# Altium PCB MVP-Module-Dash-v2.0.PcbDoc (part 6 of 6)
Units mil, origin at the board's own origin, x right, y up, seen from the top; angles counter-clockwise.
Board outline 5314.96 x 3937.01 mil, 4 copper layers (Top, GND, PWR, Bottom), stack 60.118 mil thick; 364 components, 288 nets, 1223 pads, 0 vias.
Unrouted connection lines stored in the file: 976.
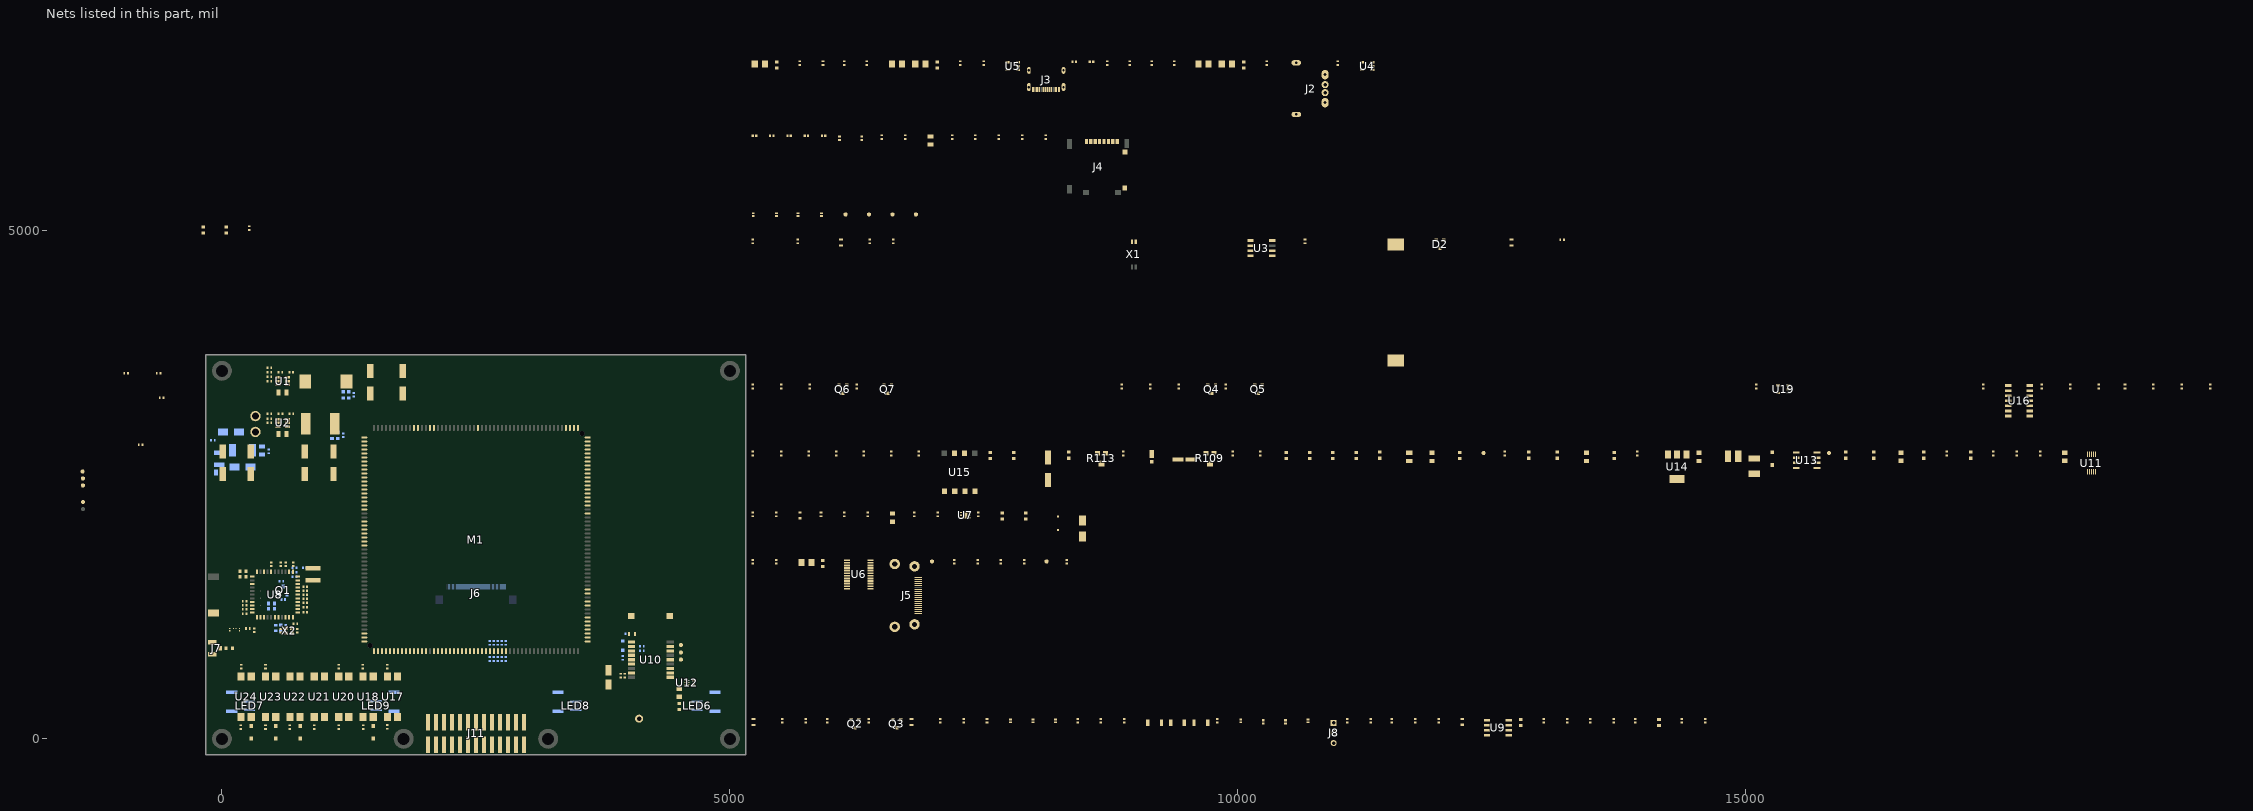
[diagram p2: the nets of this part, all layers, seen from the top]

## Part data (continued)
SW1 SW2 SW3: "SWITCH TACTILE SPST-NO 0.05A 12V", Contact Current Rating=50mA, Contact Resistance=100mR, Insulation Resistance=100MR, LCSC Part Number=C231329, Manufacturer=Omron, Max Operating Temperature=70°C, Max Voltage Rating (DC)=12V, Min Operating Temperature=-25°C, Operating Force=1.5N, Package Quantity=1, Ratings="Dust Proof,IP40", Supplier Part Number 1=SW1020DKR-ND, Actuator Length=0.4mm, Actuator Type=Standard, ComponentLink1Description=http://www.farnell.com/datasheets/60838.pdf?src-supplier=Farnell, ComponentLink1URL=http://www.farnell.com/datasheets/60838.pdf?src-supplier=Farnell, ComponentLink2Description=http://www.farnell.com/datasheets/60838.pdf?src-supplier=Element14, ComponentLink2URL=http://www.farnell.com/datasheets/60838.pdf?src-supplier=Element14, ComponentLink3Description=https://omronfs.omron.com/en_US/ecb/products/pdf/en-b3u.pdf?src-supplier=Digi-Key, ComponentLink3URL=https://omronfs.omron.com/en_US/ecb/products/pdf/en-b3u.pdf?src-supplier=Digi-Key, ComponentLink4Description=http://www.omron.com/ecb/products/pdf/en-b3u.pdf?src-supplier=Digi-Key, ComponentLink4URL=http://www.omron.com/ecb/products/pdf/en-b3u.pdf?src-supplier=Digi-Key, ComponentLink5Description=https://www.distrelec.biz/Web/Downloads/he/et/B3U_eng_datasheet.pdf?mime=application%2Fpdf&src-supplier=Distrelec, ComponentLink5URL=https://www.distrelec.biz/Web/Downloads/he/et/B3U_eng_datasheet.pdf?mime=application%2Fpdf&src-supplier=Distrelec, ComponentLink6Description=http://www.onlinecomponents.com/productFiles/mf-OM/en-b3u.pdf?src-supplier=Onlinecomponents.com, ComponentLink6URL=http://www.onlinecomponents.com/productFiles/mf-OM/en-b3u.pdf?src-supplier=Onlinecomponents.com, ComponentLink7Description=https://www.verical.com/server-webapp/html/getDatasheet?partID=552554&src-supplier=Verical, ComponentLink7URL=https://www.verical.com/server-webapp/html/getDatasheet?partID=552554&src-supplier=Verical, ComponentLink8Description=http://www.farnell.com/datasheets/1685550.pdf?src-supplier=Element14, ComponentLink8URL=http://www.farnell.com/datasheets/1685550.pdf?src-supplier=Element14, ComponentLink9Description=http://www.farnell.com/datasheets/2610940.pdf?src-supplier=Farnell, ComponentLink9URL=http://www.farnell.com/datasheets/2610940.pdf?src-supplier=Farnell, ComponentLink10Description=https://www.alliedelec.com/m/d/4c8a9ef82804fc3c241a13c1e298fd73.pdf?src-supplier=Allied+Electronics, ComponentLink10URL=https://www.alliedelec.com/m/d/4c8a9ef82804fc3c241a13c1e298fd73.pdf?src-supplier=Allied+Electronics, Contact Material=Silver, Current Rating=50mA, Depth=2.5mm, Electrical Life=200000Cycles, Height=1.2mm, Illumination Type=Non-Illuminated,Illuminated, Item Type=Switch, Lead Free="Lead Free", Length=4mm, Manufacturer Part Number=B3U-1000P, Max Current Rating=50mA, Mechanical Life=200000Cycles, Mount="Surface Mount", Orientation=Straight, Packaging="Tape and Reel", Pricing 1="1=1, 10=0.961, 25=0.9064, 50=0.7976, 100=0.7251, 250=0.68888, 500=0.67074, 1000=0.52571 (USD)", REACH SVHC=Unknown, Stock 1=116454, Supplier 1=Digi-Key, Switch Function=Off-Mom, Switch Travel=0.15mm, Termination=SMD/SMT, Throw Configuration=SPST, Voltage Rating (DC)=12V, Weight=0.000776oz, Width=3mm
U1 U2: "IC REG BUCK ADJ 3A TSOT26", Case/Package=SOT-23-6, LCSC Part Number=C2158012, Manufacturer=Diodes, Max Operating Temperature=85°C, Max Output Voltage=31V, Max Supply Voltage=32V, Min Input Voltage=3.8V, Min Operating Temperature=-40°C, Min Output Voltage=800mV, Output Current=3A, Supplier Part Number=31-AP63300WU-7CT-ND, Switching Frequency=500kHz, Category="Voltage Regulators - Switching", ComponentLink1Description=https://www.diodes.com/assets/Datasheets/AP63300-AP63301.pdf?src-supplier=Digikey, ComponentLink1URL=https://www.diodes.com/assets/Datasheets/AP63300-AP63301.pdf?src-supplier=Digikey, ComponentLink2Description=https://datasheet.octopart.com/AP63300WU-7-Diodes-Inc.-datasheet-149521342.pdf?src-supplier=Future+Electronics, ComponentLink2URL=https://datasheet.octopart.com/AP63300WU-7-Diodes-Inc.-datasheet-149521342.pdf?src-supplier=Future+Electronics, Item Type=IC, Manufacturer Part Number=AP63300WU-7, Mounting Technology="Surface Mount", Number of Outputs=1, Output Configuration=Positive, Output Type=Adjustable, Pricing="1=0.92, 10=0.818, 25=0.7764, 100=0.6379, 250=0.59628, 500=0.52696, 1000=0.41602 (USD)", RoHS=No, RoHS Compliant=Yes, Series=-, Stock=11398, Supplier=Digikey, Synchronous Rectifier=Yes
U3: "Real Time Clock (RTC) IC Clock/Calendar IÂ²C, 2-Wire Serial 8-SOIC (0.154, 3.90mm Width)", Package="SOIC-8 NXP Semiconductors", Availability=Good, Check_prices=https://www.snapeda.com/parts/PCF8563T/F4,118/NXP%20USA%20Inc./view-part/32409/?ref=eda, MF="NXP USA", MP=PCF8563T/F4,118, Price=None, Purchase-URL=https://pricing.snapeda.com/search/part/PCF8563T/F4,118/?ref=eda, SnapEDA_Link=https://www.snapeda.com/parts/PCF8563T/F4,118/NXP%20USA%20Inc./view-part/32409/?ref=snap
U4 U5: "SOT-23-5 Power Distribution Switches ROHS", LCSC Part Number=C55136, Manufacturer=Silergy, Category="USB Interface ICs", Item Type=IC, Manufacturer Part Number=SY6280AAC, RoHS=No, Stock=3000, Supplier=Avnet, Supplier Part Number=SY6280AAC
U6: "IC INTERFACE SPECIALIZED 24TSSOP", Manufacturer="Texas Instruments", Supplier Part Number=595-TPD12S016PWR, Category="Interface ICs", ComponentLink1Description=https://datasheet.ciiva.com/1784/tpd12s016-1784288.pdf?src-supplier=Digi-Key, ComponentLink1URL=https://datasheet.ciiva.com/1784/tpd12s016-1784288.pdf?src-supplier=Digi-Key, ComponentLink2Description=https://datasheet.ciiva.com/1495/1506096-1495817.pdf?src-supplier=Element14, ComponentLink2URL=https://datasheet.ciiva.com/1495/1506096-1495817.pdf?src-supplier=Element14, ComponentLink3Description=https://datasheet.ciiva.com/26911/getdatasheetpartid-349978-26911477.pdf?src-supplier=Verical, ComponentLink3URL=https://datasheet.ciiva.com/26911/getdatasheetpartid-349978-26911477.pdf?src-supplier=Verical, ComponentLink4Description=https://datasheet.ciiva.com/41460/001188042-da-01-en-ic-hdmi-esd-pr-tpd12s016pwr-tssop-24-tid-41460279.pdf?src-supplier=Conrad, ComponentLink4URL=https://datasheet.ciiva.com/41460/001188042-da-01-en-ic-hdmi-esd-pr-tpd12s016pwr-tssop-24-tid-41460279.pdf?src-supplier=Conrad, ComponentLink5Description=https://datasheet.ciiva.com/3149/tpd12s016-3149560.pdf?src-supplier=Avnet, ComponentLink5URL=https://datasheet.ciiva.com/3149/tpd12s016-3149560.pdf?src-supplier=Avnet, Manufacturer Part Number=TPD12S016PWR, Pricing="1=1.23, 10=1.11, 50=1.05, 100=0.863, 1000=0.563, 10000=0.495 (USD)", RoHS=Yes, Stock=8312, Supplier=Mouser
U7: "White LED driver with PWM brightness control in 2mm x 2mm WSON Package. up to 10 LEDs in Series 6-WSON -40 to 85", Package="WSON-6 Texas Instruments", Availability=Warning, Check_prices=https://www.snapeda.com/parts/TPS61161ADRVR/Texas%20Instruments/view-part/287925/?ref=eda, MF="Texas Instruments", MP=TPS61161ADRVR, Price=None, Purchase-URL=https://pricing.snapeda.com/search/part/TPS61161ADRVR/?ref=eda, SnapEDA_Link=https://www.snapeda.com/parts/TPS61161ADRVR/Texas%20Instruments/view-part/287925/?ref=snap
U8: "802.11ac/a/b/g/n WiFi Combo Sip Module (WiFi 5), 1T1R", Manufacturer=SparkLan, ComponentLink1Description=Sparklan, ComponentLink1URL=https://www.sparklan.com/product/ap6256-broadcom-bcm43435-sip-module/, Item Type=IC, Manufacturer Part Number=AP6256
U9: "IC TRANSCEIVER 1/1 8SOIC", LCSC Part Number=C1852061, Manufacturer="Texas Instruments", Supplier Part Number=595-TCAN1044VDRQ1, Category="Interface ICs", ComponentLink1Description=http://www.ti.com/general/docs/suppproductinfo.tsp?distId=10&amp;gotoUrl=http%3A%2F%2Fwww.ti.com%2Flit%2Fgpn%2Ftcan1044-q1&src-supplier=Digikey, ComponentLink1URL=http://www.ti.com/general/docs/suppproductinfo.tsp?distId=10&amp;gotoUrl=http%3A%2F%2Fwww.ti.com%2Flit%2Fgpn%2Ftcan1044-q1&src-supplier=Digikey, Item Type=IC, Manufacturer Part Number=TCAN1044VDRQ1, Pricing="1=1.4, 10=1.19, 50=1.19, 100=0.912, 1000=0.636, 10000=0.554 (USD)", RoHS=Yes, Stock=317, Supplier=Mouser
U10: "SMD,10.1x9.7mm Satellite Positioning Modules ROHS", LCSC Part Number=C5804601, Manufacturer=ZHONGKEWEI, Package=SMD,10.1x9.7mm, ComponentLink1Description=LCSC, ComponentLink1URL=https://www.lcsc.com/product-detail/Satellite-Positioning-Modules_ZHONGKEWEI-ATGM336H-6N-74_C5804601.html, Manufacturer Part Number=ATGM336H-6N-74
U11: "IC ADC 16BIT SIGMA-DELTA 10VSSOP", Case/Package=VSSOP, LCSC Part Number=C37593, Manufacturer="Texas Instruments", Max Operating Temperature=125°C, Max Supply Voltage=5.5V, Min Operating Temperature=-40°C, Min Supply Voltage=2V, Nominal Supply Current=150uA, Package Quantity=2500, Power Dissipation=900uW, Supplier Part Number=595-ADS1115IDGSR, Category="Analog to Digital Converters (ADCs)", ComponentLink1Description=https://datasheet.ciiva.com/4031/47725463s8438921n7713-4031028.pdf?src-supplier=Arrow+Electronics, ComponentLink1URL=https://datasheet.ciiva.com/4031/47725463s8438921n7713-4031028.pdf?src-supplier=Arrow+Electronics, Contact Plating=Gold, Conversion Rate=0.86KS/s, Height=1.07mm, Integral Nonlinearity (INL)=1LSB, Interface=I2C, Item Type=IC, Lead Free="Lead Free", Length=3mm, Manufacturer Part Number=ADS1115IDGSR, Max Supply Voltage (DC)=5.5V, Min Supply Voltage (DC)=2V, Number of A/D Converters=1, Number of Bits=16, Number of Channels=2, Number of Converters=1, Number of Inputs=4, Packaging="Tape and Reel", Pins=10, Polarity=Bipolar, Pricing="1=5.44, 10=4.76, 50=4.76, 100=4.01, 1000=2.88, 10000=2.78 (USD)", Reach SVHC Compliant=No, Resolution=16b, RoHS=Yes, RoHS Compliant=Yes, Sampling Rate=860S/s, Series=-, Stock=5925, Supplier=Mouser, Supply Type=Single, Thickness=1.02mm, Width=3mm
U12: "1.4V~3.6V 4.3mA DFN-6(1x1.6) Low Noise Amplifiers (LNA) - RF ROHS", LCSC Part Number=C92450, Manufacturer=ZHONGKEWEI, Package=DFN-6(1x1.6), ComponentLink1Description=LCSC, ComponentLink1URL=https://www.lcsc.com/product-detail/Low-Noise-Amplifiers-LNA-RF_ZHONGKEWEI-AT2659_C92450.html, Item Type=LNA, Manufacturer Part Number=AT2659
U13: "Frequency to Voltage Converter", Manufacturer_Name="Texas Instruments", Manufacturer_Part_Number=LM2917MX-8/NOPB, Mouser Part Number=926-LM2917MX-8/NOPB, Datasheet Link=http://www.ti.com/lit/gpn/LM2917-N, Geometry.Height=1.75mm, Mouser Price/Stock=https://www.mouser.co.uk/ProductDetail/Texas-Instruments/LM2917MX-8-NOPB?qs=X1J7HmVL2ZFWM%2FK6eX0xZQ%3D%3D
U14: "IC REG LIN POS ADJ 500MA SOT223", Case/Package=SOT-223-4, LCSC Part Number=C840113, Manufacturer="Texas Instruments", Max Operating Temperature=125°C, Max Output current=500mA, Max Output Voltage=37V, Max Supply Voltage=40V, Min Input Voltage=4.2V, Min Operating Temperature=-40°C, Min Output Voltage=1.25V, Package Quantity=1, Power Supply Rejection Ratio (PSRR)=80dB, Quiescent Current=3.5mA, Reference Voltage=1.3V, Supplier Part Number=595-LM317MDCYR, Category="Voltage Regulators - Linear", ComponentLink1Description=https://datasheet.ciiva.com/1643/755612-1643356.pdf?src-supplier=Newark, ComponentLink1URL=https://datasheet.ciiva.com/1643/755612-1643356.pdf?src-supplier=Newark, ComponentLink2Description=https://datasheet.ciiva.com/41458/001014040-da-01-en-ic-reg-adj-0-5-lm317mdcyr-sot-223-4-tid-41458215.pdf?src-supplier=Conrad, ComponentLink2URL=https://datasheet.ciiva.com/41458/001014040-da-01-en-ic-reg-adj-0-5-lm317mdcyr-sot-223-4-tid-41458215.pdf?src-supplier=Conrad, ComponentLink3Description=https://datasheet.ciiva.com/1512/1814942-1512040.pdf?src-supplier=Element14, ComponentLink3URL=https://datasheet.ciiva.com/1512/1814942-1512040.pdf?src-supplier=Element14, ComponentLink4Description=https://datasheet.ciiva.com/46398/755612-46398903.pdf?src-supplier=Element14, ComponentLink4URL=https://datasheet.ciiva.com/46398/755612-46398903.pdf?src-supplier=Element14, ComponentLink5Description=https://datasheet.ciiva.com/46419/1814942-46419370.pdf?src-supplier=Element14, ComponentLink5URL=https://datasheet.ciiva.com/46419/1814942-46419370.pdf?src-supplier=Element14, ComponentLink6Description=https://datasheet.ciiva.com/2042/lm317m-2042100.pdf?src-supplier=Digikey, ComponentLink6URL=https://datasheet.ciiva.com/2042/lm317m-2042100.pdf?src-supplier=Digikey, ComponentLink7Description=https://datasheet.ciiva.com/2042/lm317m-2042099.pdf?src-supplier=Digikey, ComponentLink7URL=https://datasheet.ciiva.com/2042/lm317m-2042099.pdf?src-supplier=Digikey, ComponentLink8Description=https://datasheet.ciiva.com/2042/lm317m-2042101.pdf?src-supplier=Digikey, ComponentLink8URL=https://datasheet.ciiva.com/2042/lm317m-2042101.pdf?src-supplier=Digikey, ComponentLink9Description=https://datasheet.ciiva.com/14280/lm317mq-14280776.pdf?src-supplier=Avnet, ComponentLink9URL=https://datasheet.ciiva.com/14280/lm317mq-14280776.pdf?src-supplier=Avnet, Item Type=IC, Lead Free="Lead Free", Manufacturer Part Number=LM317MDCYR, Mounting Technology="Surface Mount", Number of Outputs=1, Number of Regulators=1, Output Current=500mA, Output Type=Adjustable, Output Voltage=37V, Packaging="Tape and Reel", Pins=4, Polarity=Positive, Pricing="1=0.67, 10=0.564, 50=0.564, 100=0.428, 500=0.359, 1000=0.283, 2500=0.263, 5000=0.245, 10000=0.236, 25000=0.227 (USD)", Radiation Hardening=No, Reach SVHC Compliant=No, RoHS=Yes, RoHS Compliant=Yes, Series=-, Stock=12890, Supplier=Mouser, Weight=0.006632oz
U15: "Logic Output Optoisolator 15MBd Open Collector 5000Vrms 1 Channel 10kV/Âµs CMTI 8-SMD", Package="SMD-8 Lite-On Inc.", Check_prices=https://www.snapeda.com/parts/6N137S/Applied+Avionics/view-part/?ref=eda, MF="Lite-On Electronics", MP=6N137S, SnapEDA_Link=https://www.snapeda.com/parts/6N137S/Applied+Avionics/view-part/?ref=snap
U16: "IC INVERT SCHMITT 6CH 1IN 14SOIC", Case/Package=SOIC, High Level Output Current=-5.2mA, LCSC Part Number=C507235, Low Level Output Current=5.2mA, Manufacturer="Texas Instruments", Max Operating Temperature=125°C, Max Supply Voltage=6V, Min Operating Temperature=-40°C, Min Supply Voltage=2V, Operating Supply Voltage=5V, Output Current=25mA, Package Quantity=1, Quiescent Current=2uA, Supplier Part Number=595-SN74HC14QDRQ1, Category="Logic Gates", ComponentLink1Description=https://datasheet.ciiva.com/15089/getdatasheetpartid-126971-15089251.pdf?src-supplier=Verical, ComponentLink1URL=https://datasheet.ciiva.com/15089/getdatasheetpartid-126971-15089251.pdf?src-supplier=Verical, ComponentLink2Description=https://datasheet.ciiva.com/1864/sn74hc14-q1-1864939.pdf?src-supplier=Digikey, ComponentLink2URL=https://datasheet.ciiva.com/1864/sn74hc14-q1-1864939.pdf?src-supplier=Digikey, ComponentLink3Description=https://datasheet.ciiva.com/1864/sn74hc14-q1-1864938.pdf?src-supplier=Digikey, ComponentLink3URL=https://datasheet.ciiva.com/1864/sn74hc14-q1-1864938.pdf?src-supplier=Digikey, ComponentLink4Description=https://datasheet.ciiva.com/1864/sn74hc14-q1-1864940.pdf?src-supplier=Digikey, ComponentLink4URL=https://datasheet.ciiva.com/1864/sn74hc14-q1-1864940.pdf?src-supplier=Digikey, ComponentLink5Description=https://datasheet.ciiva.com/14288/sn74hc14-q1-14288654.pdf?src-supplier=Avnet, ComponentLink5URL=https://datasheet.ciiva.com/14288/sn74hc14-q1-14288654.pdf?src-supplier=Avnet, ComponentLink6Description=https://datasheet.ciiva.com/48703/001073384-da-01-en-ic-hex-schmitt-sn74hc14qdrq1-soic-14-tid-48703180.pdf?src-supplier=Conrad, ComponentLink6URL=https://datasheet.ciiva.com/48703/001073384-da-01-en-ic-hex-schmitt-sn74hc14qdrq1-soic-14-tid-48703180.pdf?src-supplier=Conrad, Height=1.58mm, Input Type="SCHMITT TRIGGER", Item Type=IC, Lead Free="Lead Free", Length=8.65mm, Logic Function="Buffer,Inverter,Schmitt Trigger", Manufacturer Part Number=SN74HC14QDRQ1, Mounting Technology="Surface Mount", Number of Bits=6, Number of Circuits=6, Number of Elements=6, Number of Gates=6, Number of Inputs=6, Packaging="Tape and Reel", Pins=14, Pricing="1=0.68, 10=0.601, 50=0.601, 100=0.503, 1000=0.392, 10000=0.3 (USD)", Propagation Delay=21ns, Radiation Hardening=No, Reach SVHC Compliant=No, RoHS=Yes, RoHS Compliant=Yes, Schmitt Trigger Input=Yes, Series=74HC, Stock=6966, Supplier=Mouser, Technology=CMOS, Turn-On Delay Time=21ns, Weight=0.004318oz, Width=3.91mm
U17 U18 U20 U21 U22 U23 U24: "70V 5kV 50mA 100mV@1mA,20mA 1 6V 1.2V DC SMD-4 Transistor Output Optocoupler ROHS", LCSC Part Number=C2936043, Manufacturer=Slkor, Package=SMD-4, ComponentLink1Description=LCSC, ComponentLink1URL=https://www.lcsc.com/product-detail/Transistor-Output-Optocoupler_Slkor-SLKORMICRO-Elec-PC817C_C2936043.html, Item Type=IC, Manufacturer Part Number=PC817C
U19: "IC BUFFER SCHMITT TRIGGER 5TSOP", LCSC Part Number=C6076, Manufacturer=Nexperia, Supplier Part Number=9876707, Category="Logic Gates", ComponentLink1Description=http://www.farnell.com/datasheets/2185283.pdf?src-supplier=Farnell, ComponentLink1URL=http://www.farnell.com/datasheets/2185283.pdf?src-supplier=Farnell, ComponentLink2Description=https://datasheet.octopart.com/74LVC1G17GV%2C125-Nexperia-datasheet-11799833.pdf?src-supplier=Farnell, ComponentLink2URL=https://datasheet.octopart.com/74LVC1G17GV%2C125-Nexperia-datasheet-11799833.pdf?src-supplier=Farnell, ComponentLink3Description=https://assets.nexperia.com/documents/data-sheet/74LVC1G17.pdf?src-supplier=Digikey, ComponentLink3URL=https://assets.nexperia.com/documents/data-sheet/74LVC1G17.pdf?src-supplier=Digikey, ComponentLink4Description=https://datasheet.octopart.com/74LVC1G17GV%2C125-Nexperia-datasheet-116120530.pdf?src-supplier=Future+Electronics, ComponentLink4URL=https://datasheet.octopart.com/74LVC1G17GV%2C125-Nexperia-datasheet-116120530.pdf?src-supplier=Future+Electronics, ComponentLink5Description=https://datasheet.octopart.com/74LVC1G17GV%2C125-Nexperia-datasheet-73818103.pdf?src-supplier=Element14, ComponentLink5URL=https://datasheet.octopart.com/74LVC1G17GV%2C125-Nexperia-datasheet-73818103.pdf?src-supplier=Element14, ComponentLink6Description=https://datasheet.octopart.com/74LVC1G17GV%2C125-NXP-Semiconductors-datasheet-13026859.pdf?src-supplier=Newark, ComponentLink6URL=https://datasheet.octopart.com/74LVC1G17GV%2C125-NXP-Semiconductors-datasheet-13026859.pdf?src-supplier=Newark, Item Type=IC, Manufacturer Part Number=74LVC1G17GV,125, Number of Channels=1NUMBER, Packaging=10Packaging, Pins=5NUMBER, Pricing="3000=0.0334, 9000=0.0322, 30000=0.031, 60000=0.0303, 120000=0.029 (USD)", RoHS=Yes, RoHS Compliant=Yes, Stock=513000, Supplier="Future Electronics"
X1: library part Q13MC14620001, "32.768kHz 7pF ±20ppm MC-146 Crystals ROHS", LCSC Part Number=C3013800, Manufacturer="Seiko Epson", Package=MC-146, ComponentLink1Description=LCSC, ComponentLink1URL=https://www.lcsc.com/product-detail/Crystals_Seiko-span-style-background-color-ff0-Epson-span-Q13MC14620001_C3013800.html, Item Type=Crystals, Manufacturer Part Number=Q13MC14620001
X2: library part Q22FA12800078, "37.4MHz SMD Crystal Resonator 9pF 60Ω ±10ppm -40℃~+85℃ SMD2016-4P Crystals", LCSC Part Number=C255897, Manufacturer=Seiko, ComponentLink1Description=LCSC, ComponentLink1URL=https://www.lcsc.com/product-detail/Crystals_Seiko-Epson-Q22FA12800078_C255897.html, Manufacturer Part Number=Q22FA12800078

## Free pads (board coordinates)
  round 196.85 hole 118.11: MH0(0,3622.05) MH0(0,3622.05) MH0(0,0) MH0(1788.92,0) MH0(3211.08,0) MH0(5000,3622.05) MH0(5000,0)

## Nets (pads, with @x,y where several pads share a name; then routed paths per layer and width w, separated by ;. In a path a pad name is that pad's centre, name@x,y a point inside that pad or via, vN(x,y) a via of type N, cw(c..) or ccw(c..) an arc to the next point about the centre after c; other vN are vias at no path point)
BT_REG_ON: R41.2 R42.2 U8.34
BT_WAKE_HOST: Q1.2 R54.1 U8.7
BUTTON_CENTER: J11.21 R127.1 U19.2
BUTTON_CENTER#: M1.66 U19.4
BUTTON_DOWN: J11.22 R124.1 U16.9
BUTTON_DOWN#: M1.68 U16.8
BUTTON_LEFT: J11.25 R121.1 U16.1
BUTTON_LEFT#: M1.71 U16.2
BUTTON_RIGHT: J11.24 R122.1 U16.3
BUTTON_RIGHT#: M1.70 U16.4
BUTTON_UP: J11.23 R123.1 U16.5
BUTTON_UP#: M1.69 U16.6
CAN1_RX_M1: M1.54 R80.2
CAN1_TX_M1: M1.53 R78.2
CAN_VSS: C63.2 C64.1 FB3.2 J11.13
CANH_N: D15.1 J11.12 R77.1 R81.2
CANH_P: D14.1 J11.11 R76.1 R79.2
CLK-32.768: R72.1 U3.7
COOLANT_NTC1: J11.4 R117.2
COOLANT_NTC2: J11.5 R119.1 U11.5
DC_IN_12V: C5.2 D28.1 F1.1 P1.1 R1.2
ENC_A: J11.19 R125.1 U16.11
ENC_A#: M1.63 U16.10
ENC_B: J11.20 R126.1 U16.13
ENC_B#: M1.64 U16.12
ENGINE: LED7.2 R141.2
ENGINE_TEMP: D25.2 J11.16
ENGINE_TEMP_SIG: M1.114 U22.4
EXT_EN: M1.15 R11.1
FUEL-LEVEL: D23.2 J11.9 P10.1 R108.2 U11.6 U14.1
GND: C2.1 C3.2 C4.2 C5.1 C6.1 C7.1 C8.2 C9.2 C11.1 C12.1 C13.1 C14.1 C15.1 C16.1 C18.1 C19.2 C20.2 C22.1 C23.1 C24.1 C25.1 C26.1 C27.1 C28.1 C29.1 C30.1 C31.1 C32.1 C33.1 C34.1 C35.1 C36.1 C37.1 C38.1 C39.1 C40.1 C41.1 C42.1 C43.1 C44.1 C45.1 C46.1 C47.1 C48.2 C49.1 C50.1 C53.1 C54.1 C55.2 C56.1 C57.1 C58.2 C59.1 C60.1 C61.1 C62.1 C64.2 C65.1 C68.2 C70.2 C71.1 C72.1 C73.1 C75.1 C76.1 C77.2 C78.2 C79.2 C80.2 C81.1 C82.1 C83.1 C84.1 D1.2 D3.2 D4.2 D5.2 D6.2 D7.2 D8.2 D9.2 D10.2 D11.2 D13.2 D14.2 D15.2 D16.2 D17.2 D18.2 D19.2 D22.1 D23.1 D29.1 D30.1 D31.1 D32.1 FB3.1 FB5.2 J1.2 J2.4 J2.MH1 J2.MH2 J3.A1/B12 J3.B1/A12 J4.6 J4.10 J5.2 J5.5 J5.8 J5.11 J5.17 J6.1 J6.2 J6.7 J6.9 J6.10 J6.13 J6.16 J6.19 J6.22 J6.25 J7.2 J7.3 J8.3 J9.2 J10.2 J11.8 J11.10 J11.26 L4.1 L5.1 LED1.2 LED2.2 M1.3 M1.4 P4.1 Q2.2 Q3.2 Q4.2 Q5.2 Q6.2 Q7.2 R5.1 R6.1 R13.1 R17.1 R20.1 R21.1 R22.1 R23.1 R34.1 R38.1 R42.1 R47.1 R48.2 R82.1 R90.1 R91.1 R97.1 R103.1 R104.1 R105.1 R106.2 R111.1 R113.1 R114.1 R119.2 R144.1 R145.1 R152.1 R153.1 SB1.2 SB8.1 SB9.1 SW1.2 SW2.2 SW3.2 U1.4 U2.4 U3.4 U4.2 U5.2 U6.6 U6.14 U6.19 U7.3 U7.7 U8.1 U8.3 U8.20 U8.31 U8.33 U8.36 U9.2 U10.1 U10.10 U10.12 U12.1 U12.2 U13.8 U15.5 U16.7 U17.2 U17.3 U18.3 U19.3 U20.2 U20.3 U21.2 U21.3 U22.3 U23.3 U24.3 X2.2 X2.4
GPS_RX: R98.2 U10.3
GPS_TX: R99.2 U10.2
H_BEAM: J11.17 R135.1
H_BEAM_SIG: M1.107 U21.4
HDMI1_CEC_CON: J5.13 U6.7
HDMI1_DDC_SCL: J5.15 U6.8
HDMI1_DDC_SDA: J5.16 U6.9
HDMI1_HPD_CON: J5.19 U6.10
HDMI1_VDISP: C43.2 J5.18 U6.13
HDMI_CT_HPD: M1.22 R32.1 TP1.1
HDMI_LS_OE: M1.23 R33.1 TP2.1
HDMI_TX0_N: J5.9 M1.151 U6.17
HDMI_TX0_P: J5.7 M1.152 U6.18
HDMI_TX1_N: J5.6 M1.153 U6.20
HDMI_TX1_P: J5.4 M1.154 U6.21
HDMI_TX2_N: J5.3 M1.155 U6.22
HDMI_TX2_P: J5.1 M1.156 U6.23
HDMI_TX_HPDIN: M1.160 U6.4
HDMI_TXCLK_N: J5.12 M1.149 U6.15
HDMI_TXCLK_P: J5.10 M1.150 U6.16
HDMITX_CEC_M0: M1.159 U6.1
HDMITX_SCL: M1.157 U6.2
HDMITX_SDA: M1.158 U6.3
HI_BEAM: LED9.2 R149.2
HOST_WAKE_BT: R46.2 R47.2 U8.6
HPL_OUT: D30.2 M1.17 TP4.1
HPR_OUT: D29.2 M1.16 TP3.1
I2C3_SCL_M0: M1.109 U11.10
I2C3_SDA_M0: M1.110 U11.9
I2C5_SCL_M0: M1.51 R12.2
I2C5_SDA_M0: M1.50 R14.2
INDICATOR: LED6.2 R140.2
LCD0_RST: J6.5 R39.1 R40.2
LED_DIY: LED4.2 R87.1
LED_WORK: LED3.2 R86.1
LEDA: C45.2 D12.1 J6.27
LEDK: J6.29 R37.2
LEFT_TURN: J11.14 R130.1
LEFT_TURN_SIG: M1.106 R128.1 U17.4
MIPI_DSI_TX0_CLK_N: J6.18 M1.144
MIPI_DSI_TX0_CLK_P: J6.17 M1.143
MIPI_DSI_TX0_D0_N: J6.24 M1.148
MIPI_DSI_TX0_D0_P: J6.23 M1.147
MIPI_DSI_TX0_D1_N: J6.21 M1.146
MIPI_DSI_TX0_D1_P: J6.20 M1.145
MIPI_DSI_TX0_D2_N: J6.15 M1.142
MIPI_DSI_TX0_D2_P: J6.14 M1.141
MIPI_DSI_TX0_D3_N: J6.12 M1.140
MIPI_DSI_TX0_D3_P: J6.11 M1.139
NetAnt1_1: ANT1.1 C52.2 L5.2
NetAnt2_1: Ant2.1 C69.2
NetC1_1: C1.1 L1.1 U1.5
NetC1_2: C1.2 U1.6
NetC10_1: C10.1 R3.1 R5.2 U1.1
NetC14_2: C14.2 R1.1
NetC15_2: C15.2 R4.2 R6.2 U1.2
NetC16_2: C16.2 D2.3 U3.8
NetC17_1: C17.1 L2.1 U2.5
NetC17_2: C17.2 U2.6
NetC21_1: C21.1 R10.1 R13.2 U2.1
NetC25_2: C25.2 U3.1 X1.1
NetC26_2: C26.2 U3.2 X1.4
NetC37_2: C37.2 J3.S1 J3.S2 J3.S3 J3.S4 R23.2
NetC41_2: C41.2 J5.S1 J5.S2 J5.S3 J5.S4 R34.2
NetC46_2: C46.2 U7.2
NetC49_2: C49.2 C50.2 FB2.2 U8.9
NetC51_1: C51.1 R43.2
NetC51_2: C51.2 J7.1
NetC52_1: C52.1 L4.2 R44.2
NetC53_2: C53.2 U8.10 X2.1
NetC54_2: C54.2 R45.1 X2.3
NetC57_2: C57.2 L6.1 U8.23
NetC63_1: C63.1 R76.2 R77.2
NetC65_2: C65.2 D19.1 R85.1 SW3.1
NetC66_1: C66.1 C67.1 FB4.1 U11.1 U11.8
NetC66_2: C66.2 C67.2 FB5.1 U11.3
NetC69_1: C69.1 L7.2
NetC74_1: C74.1 P9.1 R105.2 U13.1
NetC74_2: C74.2 D21.1 R104.2
NetC76_2: C76.2 U13.2
NetC77_1: C77.1 R109.3 R110.2 R111.2 U13.3
NetC78_1: C78.1 SB7.1
NetD2_2: D2.2 J1.1
NetD3_1: D3.1 J2.3 R18.2
NetD4_1: D4.1 J2.2 R15.2
NetD5_1: D5.1 J4.9 R29.2
NetD6_1: D6.1 J4.8 R28.2
NetD7_1: D7.1 J4.7 R27.2
NetD9_1: D9.1 J4.3 R26.2
NetD10_1: D10.1 J4.2 R25.2
NetD11_1: D11.1 J4.1 R24.2
NetD12_2: D12.2 L3.2 U7.4
NetD17_1: D17.1 R83.1 SW1.1
NetD18_1: D18.1 R84.1 SW2.1
NetD20_1: D20.1 R96.2
NetD21_2: D21.2 R102.2 R103.2
NetD22_2: D22.2 R100.2 R101.1 U13.5
NetD24_1: D24.1 U18.2
NetD25_1: D25.1 U22.2
NetD26_1: D26.1 U23.2
NetD27_1: D27.1 U24.2
NetD28_2: D28.2 J10.1
NetJ3_A5: J3.A5 R21.2
NetJ3_B5: J3.B5 R22.2
NetJ9_1: J9.1 R96.1 U10.6
NetL6_2: L6.2 U8.21
NetL7_1: L7.1 U12.3
NetLED1_1: LED1.1 R2.1
NetLED2_1: LED2.1 R7.1
NetLED5_1: LED5.1 R92.2
NetLED5_2: LED5.2 U10.4
NetM1_27: M1.27 R89.1
NetM1_28: M1.28 R88.1
NetM1_59: M1.59 R142.1
NetM1_60: M1.60 R150.1
NetM1_61: M1.61 R143.1
NetM1_62: M1.62 R151.1
NetM1_65: M1.65 R40.1
NetM1_72: M1.72 R46.1
NetM1_73: M1.73 Q1.3 R53.1
NetM1_74: M1.74 R41.1
NetM1_79: M1.79 R48.1 U8.12
NetM1_80: M1.80 U8.13
NetM1_111: M1.111 R94.1 U11.2
NetM1_137: M1.137 R36.1
NetM1_197: M1.197 R16.1
NetM1_198: M1.198 R19.1
NetP6_1: P6.1 U10.17
NetP7_1: P7.1 U10.16
NetP8_1: P8.1 U10.14
NetQ2_1: Q2.1 R88.2 R90.2
NetQ2_3: Q2.3 R86.2
NetQ3_1: Q3.1 R89.2 R91.2
NetQ3_3: Q3.3 R87.2
NetQ4_1: Q4.1 R142.2 R144.2
NetQ4_3: Q4.3 R140.1
NetQ5_1: Q5.1 R143.2 R145.2
NetQ5_3: Q5.3 R141.1
NetQ6_1: Q6.1 R150.2 R152.2
NetQ6_3: Q6.3 R148.1
NetQ7_1: Q7.1 R151.2 R153.2
NetQ7_3: Q7.3 R149.1
NetR11_2: R11.2 U2.2
NetR12_1: R12.1 U3.6
NetR14_1: R14.1 U3.5
NetR16_2: R16.2 U4.4
NetR17_2: R17.2 U4.3
NetR19_2: R19.2 U5.4
NetR20_2: R20.2 U5.3
NetR30_1: R30.1 R32.2 U6.12
NetR31_1: R31.1 R33.2 U6.5
NetR35_1: R35.1 R36.2 U7.5
NetR37_1: R37.1 R38.2 U7.1
NetR43_1: R43.1 R44.1 U8.2
NetR45_2: R45.2 U8.11
NetR49_1: R49.1 U8.44
NetR50_1: R50.1 U8.43
NetR51_2: R51.2 U8.14
NetR52_1: R52.1 U8.42
NetR55_2: R55.2 U8.15
NetR56_1: R56.1 U8.41
NetR57_2: R57.2 U8.16
NetR58_2: R58.2 U8.18
NetR59_2: R59.2 U8.19
NetR71_1: R71.1 R72.2 U8.24
NetR78_1: R78.1 U9.1
NetR79_1: R79.1 U9.7
NetR80_1: R80.1 U9.4
NetR81_1: R81.1 U9.6
NetR82_2: R82.2 U9.8
NetR93_2: R93.2 U10.5
NetR95_1: R95.1 R97.2 U11.7
NetR100_1: R100.1 U13.6
NetR106_1: R106.1 SB2.2
NetR107_1: R107.1 SB2.1 U13.4 U13.7
NetR107_2: R107.2 SB3.1 SB4.2 SB5.2 SB6.2 SB7.2
NetR108_1: R108.1 U14.2 U14.4
NetR109_1: R109.1 R109.2 SB8.2
NetR110_1: R110.1 SB9.2
NetR112_1: R112.1 R113.2
NetR112_2: R112.2 SB4.1
NetR113_3: R113.3 SB5.1
NetR114_2: R114.2 SB6.1
NetR115_2: R115.2 U15.2
NetR116_1: R116.1 U15.7
NetR120_2: R120.2 U15.3
NetR130_2: R130.2 U17.1
NetR131_2: R131.2 U18.1
NetR134_2: R134.2 U20.1
NetR135_2: R135.2 U21.1
NetR138_2: R138.2 U22.1
NetR139_2: R139.2 U23.1
NetR147_2: R147.2 U24.1
NetSB1_1: SB1.1 U8.29
NetU10_11: U10.11 U12.6
NEUTRAL: D24.2 J11.18 LED8.2 R148.2
NEUTRAL_SIG: M1.108 R129.1 U18.4
OIL_PRESSURE: D26.2 J11.3
OIL_PRESSURE_SIG: M1.182 R137.1 U23.4
OIL_TEMP: D27.2 J11.2
OIL_TEMP_SIG: M1.115 R146.1 U24.4
RESETn: M1.12 R83.2
RIGHT_TURN: J11.15 R134.1
RIGHT_TURN_SIG: M1.105 R132.1 U20.4
RK809_PWRON: M1.13 R85.2
SARADC_VIN0_KEY/RECOVERY: M1.14 R84.2
SDMMC0_CLK: D8.1 J4.5 M1.11
SDMMC0_CMD: M1.10 R26.1
SDMMC0_D0: M1.9 R27.1
SDMMC0_D1: M1.8 R28.1
SDMMC0_D2/ARMJTAG_TCK: M1.7 R24.1
SDMMC0_D3/ARMJTAG_TMS: M1.6 R25.1
SDMMC0_DET_L: M1.5 R29.1
SDMMC2_CLK: R70.2 U8.17
SDMMC2_CLK_M0: M1.81 R70.1
SDMMC2_CMD: R57.1 R69.2
SDMMC2_CMD_M0: M1.82 R68.2 R69.1
SDMMC2_D0: R58.1 R61.2
SDMMC2_D0_M0: M1.86 R60.2 R61.1
SDMMC2_D1: R59.1 R63.2
SDMMC2_D1_M0: M1.85 R62.2 R63.1
SDMMC2_D2: R51.1 R65.2
SDMMC2_D2_M0: M1.84 R64.2 R65.1
SDMMC2_D3: R55.1 R67.2
SDMMC2_D3_M0: M1.83 R66.2 R67.1
SPARK_COIL: J11.1 R102.1
SPEED_PWM: M1.52 R118.1 U15.6
SPEED_SENSOR: J11.7 R120.1
SPKN_OUT: D32.2 M1.19 TP6.1
SPKP_OUT: D31.2 M1.18 TP5.1
TACH_ADC: SB3.2 U11.4
UART2_RX_M0_DEBUG: M1.55 R75.2
UART2_RXD: D13.1 J8.1 R75.1
UART2_TX_M0_DEBUG: M1.56 R74.2
UART2_TXD: D16.1 J8.2 R74.1
UART3_RX_M1: M1.57 R99.1
UART3_TX_M1: M1.58 R98.1
UART8_CTSn_M0: M1.77 R56.2
UART8_RTSn_M0: M1.78 R49.2
UART8_RX_M0: M1.75 R52.2
UART8_TX_M0: M1.76 R50.2
USB2_HOST2_D_N: M1.117 R15.1
USB2_HOST2_D_P: M1.118 R18.1
USB3_OTG0_D_N: J3.A7 J3.B7 M1.193
USB3_OTG0_D_P: J3.A6 J3.B6 M1.194
VCC3V3_SD: C38.2 C39.2 J4.4 M1.24
VCC3V3_SYS: C8.1 C9.1 C10.2 C11.2 C12.2 C13.2 C68.1 C70.1 C71.2 C72.2 C73.2 C79.1 C80.1 C81.2 C82.2 C83.2 C84.2 D2.1 D20.2 FB2.1 FB4.2 L1.2 M1.1 M1.2 P3.1 R2.2 R3.2 R92.1 R93.1 R116.2 R117.1 R118.2 R121.2 R122.2 R123.2 R124.2 R125.2 R126.2 R127.2 R128.2 R129.2 R132.2 R137.2 R146.2 U10.8 U12.4 U12.5 U15.8 U16.14 U19.5
VCC5V0_SYS: C19.1 C20.1 C21.2 C22.2 C23.2 C24.2 L2.2 R7.2 R8.1 R9.1 R10.2
VCC5V0_USB: C27.2 C32.2 R9.2 U4.5 U5.5
VCC5V0_USB20_HOST: C28.2 C29.2 C30.2 C31.2 J2.1 U4.1
VCC5V0_USB_OTG0: C33.2 C34.2 C35.2 C36.2 J3.A4/B9 J3.B4/A9 U5.1
VCC12V_DCIN: C2.2 C3.1 C4.1 C6.2 C7.2 C18.2 C75.2 D1.1 F1.2 J11.6 P2.1 R4.1 R95.2 R101.2 R115.1 R131.1 R138.1 R139.1 R147.1 U1.3 U2.3 U14.3
VCC_1V8: M1.26 R73.1 R94.2
VCC_3V3: C40.2 C59.2 C60.2 FB1.1 LED3.1 LED4.1 M1.25 R30.2 R31.2 R35.2 R39.2 R53.2 U6.24 U9.5
VCC_3V3_LCD: C47.2 C48.1 FB1.2 J6.3
VCC_5V0: C42.2 C44.2 C61.2 C62.2 L3.1 LED6.1 LED7.1 LED8.1 LED9.1 R8.2 U6.11 U7.6 U9.3
VCCIO_WL: C55.1 C56.2 C58.1 Q1.1 R54.2 R60.1 R62.1 R64.1 R66.1 R68.1 R71.2 R73.2 U8.22
pads on no net: ANT1.2 J3.A8 J3.B8 J3.MH J4.11 J4.12 J4.13 J4.14 J4.15 J5.14 J6.4 J6.6 J6.8 J6.26 J6.28 J6.30 J6.S1 J6.S2 LED6.3 LED7.3 LED8.3 LED9.3 M1.20 M1.21 M1.29 M1.30 M1.31 M1.32 M1.33 M1.34 M1.35 M1.36 M1.37 M1.38 M1.39 M1.40 M1.41 M1.42 M1.43 M1.44 M1.45 M1.46 M1.47 M1.48 M1.49 M1.67 M1.87 M1.88 M1.89 M1.90 M1.91 M1.92 M1.93 M1.94 M1.95 M1.96 M1.97 M1.98 M1.99 M1.100 M1.101 M1.102 M1.103 M1.104 M1.112 M1.113 M1.116 M1.119 M1.120 M1.121 M1.122 M1.123 M1.124 M1.125 M1.126 M1.127 M1.128 M1.129 M1.130 M1.131 M1.132 M1.133 M1.134 M1.135 M1.136 M1.138 M1.161 M1.162 M1.163 M1.164 M1.165 M1.166 M1.167 M1.168 M1.169 M1.170 M1.171 M1.172 M1.173 M1.174 M1.175 M1.176 M1.177 M1.178 M1.179 M1.180 M1.181 M1.183 M1.184 M1.185 M1.186 M1.187 M1.188 M1.189 M1.190 M1.191 M1.192 M1.195 M1.196 M1.199 M1.200 M1.201 M1.202 M1.203 M1.204 M1.205 M1.206 M1.207 M1.208 M1.209 M1.210 P5.1 U3.3 U8.4 U8.5 U8.8 U8.25 U8.26 U8.27 U8.28 U8.30 U8.32 U8.35 U8.37 U8.38 U8.39 U8.40 U8.45 U8.46 U8.47 U10.7 U10.9 U10.13 U10.15 U10.18 U15.1 U15.4 U19.1 X1.2 X1.3

## Keep-outs
Keep-Out Layer:
  lines w10: -157.06,1188.23 89,1188.23 89,1644.93 -157.06,1644.93 -157.06,1188.23

## Silkscreen, mask and mechanical layers (free items; w line width, h text height)
Top Overlay:
  text "DC IN [12V]" at -96.55,3239.37 h50
  text "12V [VCC]" at -1329.28,2621.55 h40
  text "12V [DC]" at -1329.24,2554.74 h40
  text "GND" at -1329.58,2482.68 h40
  text "1PPS" at 4117.54,1019.73 h40
  text "TXD1" at 4554.58,914.4 h30
  text "RXD1" at 4555.16,840.75 h30
  text "VCC[RF]" at 4555.26,772.6 h30
Bottom Overlay:
  text "ENGINE TEMP" at 419.71,413.66 h40
  text "HIGH BEAM" at 1620.57,413.66 h40
  text "NEUTRAL" at 3566.6,414.14 h40
  text "INDICATORS" at 4773.76,413.66 h40
Board Outline:
  the board outline again, w5

## Dimensions
5157.48,3779.53 to -157.48,3779.53 on Dimensions

## Text inside footprints (layer, text, board x,y; h text height)
J2: Top Overlay "1" at 10792.23,6543.45 h19.68 r270; Mechanical 13 "PCB Edge" at 10510.09,6461.25 h31.5 r270
J3: Mechanical 13 "PCB Edge" at 8165.76,6603.18 h31.5 r180
J4: Mechanical 13 "PCB Edge" at 8847.74,5931.03 h31.5 r180
J5: Top Overlay "PCB Edge" at 6500.09,1490.25 h31.5 r270
J6: Bottom Overlay "1" at 2790.61,1426.78 h30